# Allegro board motor_encoder_brd_updated.brd
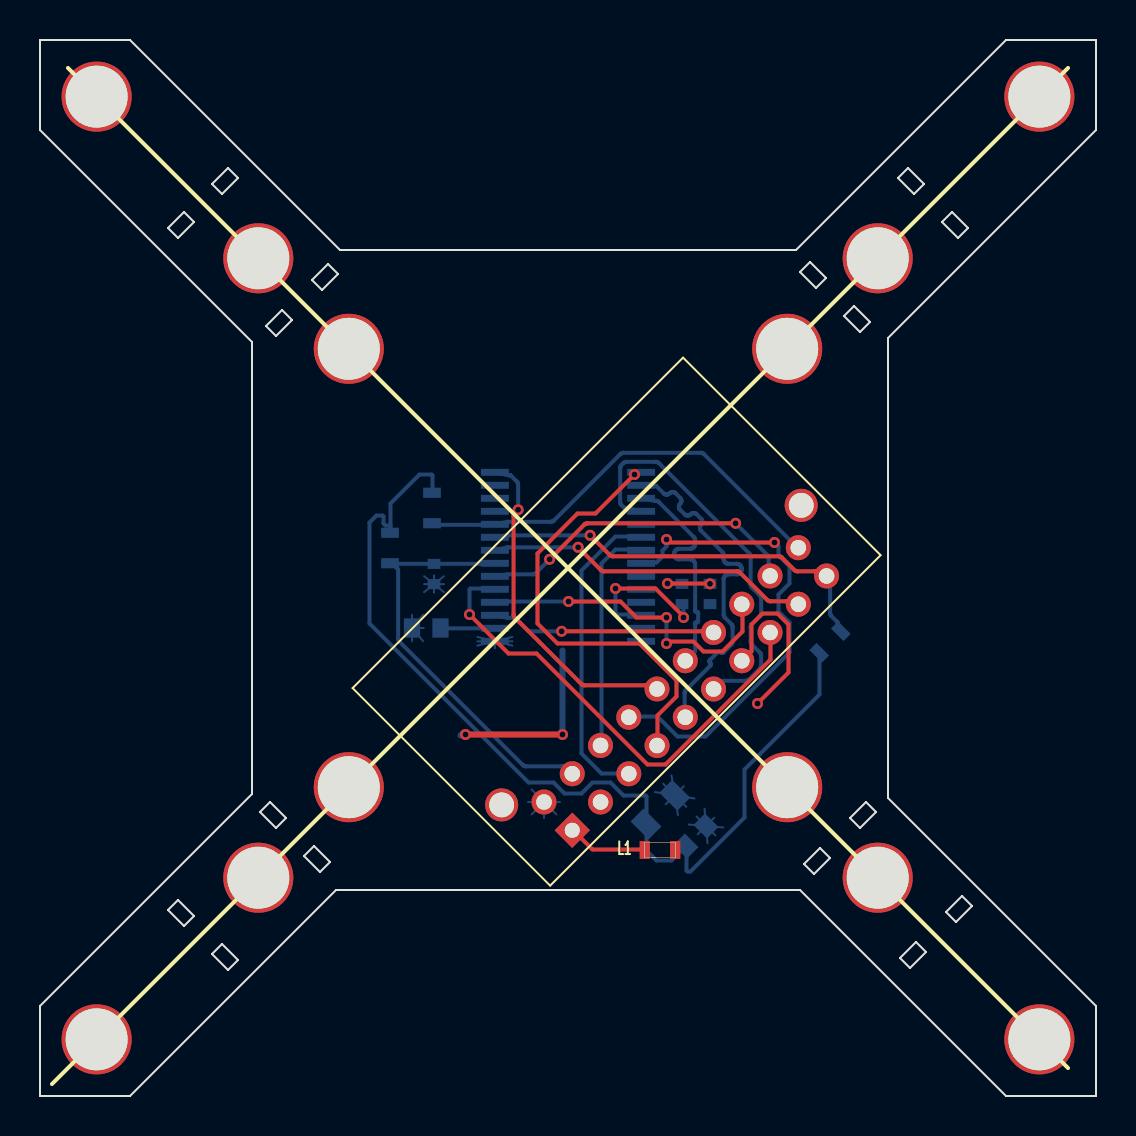
[diagram p0: board, top side]
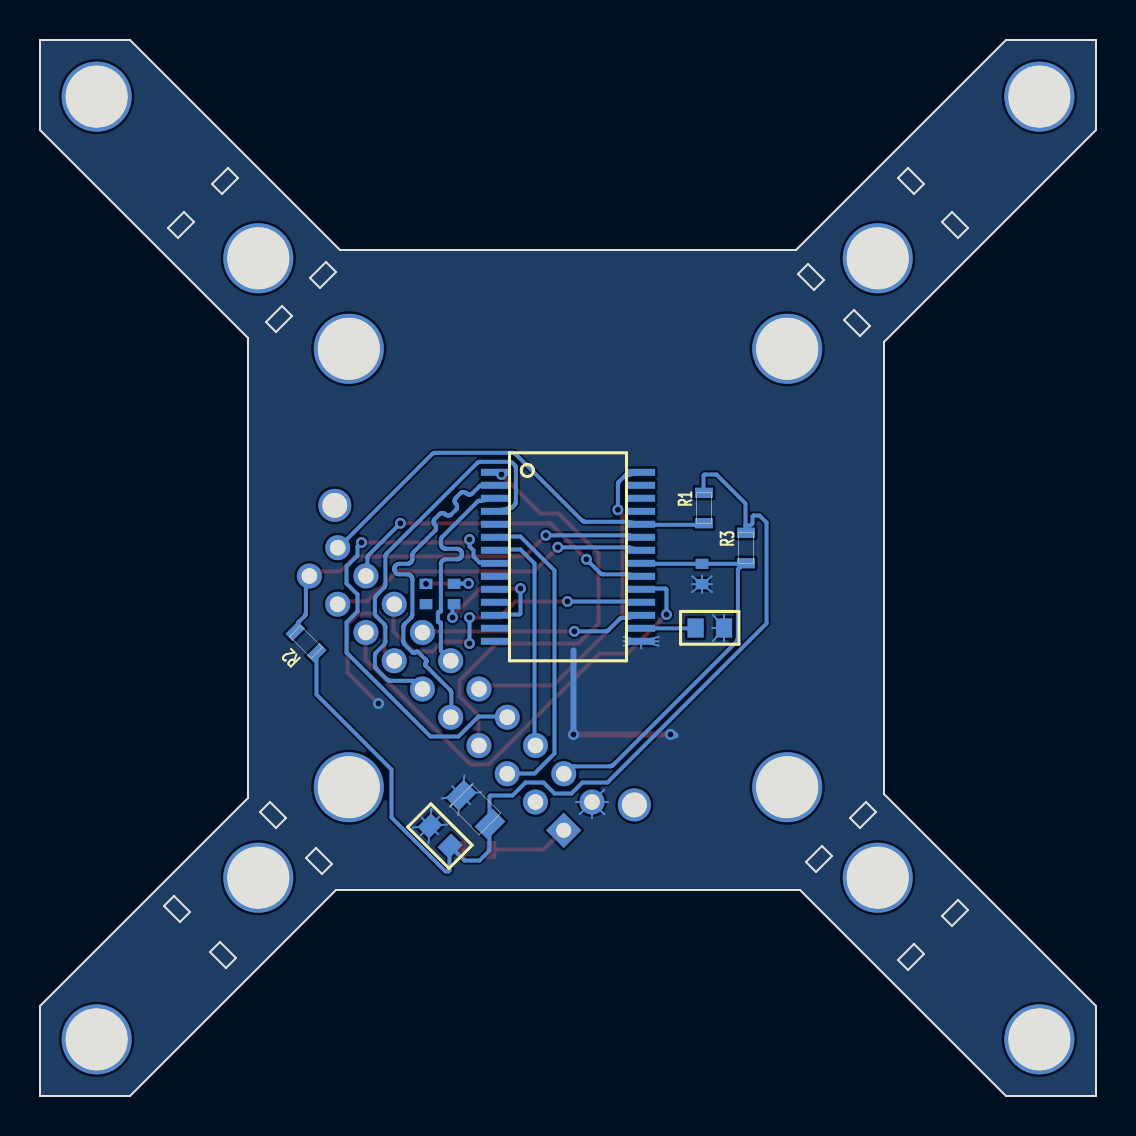
[diagram p1: board, bottom side, seen from below]

Outline 52.8 x 52.8 mm; copper layers: TOP, BOTTOM. Coordinates in mm from the lower left corner of the outline.
Outline path: 0,52.8 0,48.3 10.6,37.7 10.6,15.1 0,4.5 0,0 4.5,0 14.8,10.3 38,10.3 48.3,0 52.8,0 52.8,4.5 42.4,14.9 42.4,37.9 52.8,48.3 52.8,52.8 48.3,52.8 37.8,42.3 15,42.3 4.5,52.8 0,52.8 ; 6.4,43.4 7.2,44.2 7.7,43.7 6.9,42.9 6.4,43.4 ; 6.4,9.3 6.9,9.8 7.7,9 7.2,8.5 6.4,9.3 ; 8.6,45.6 9.4,46.4 9.9,45.9 9.1,45.1 8.6,45.6 ; 8.6,7.1 9.1,7.6 9.9,6.8 9.4,6.3 8.6,7.1 ; 11,14.2 11.5,14.7 12.3,13.9 11.8,13.4 11,14.2 ; 11.3,38.5 12.1,39.3 12.6,38.8 11.8,38 11.3,38.5 ; 13.2,12 13.7,12.5 14.5,11.7 14,11.2 13.2,12 ; 13.6,40.8 14.4,41.6 14.9,41.1 14.1,40.3 13.6,40.8 ; 38,41.2 38.5,41.7 39.3,40.9 38.8,40.4 38,41.2 ; 38.2,11.6 39,12.4 39.5,11.9 38.7,11.1 38.2,11.6 ; 40.2,39 40.7,39.5 41.5,38.7 41,38.2 40.2,39 ; 40.5,13.9 41.3,14.7 41.8,14.2 41,13.4 40.5,13.9 ; 42.9,45.9 43.4,46.4 44.2,45.6 43.7,45.1 42.9,45.9 ; 43,6.9 43.8,7.7 44.3,7.2 43.5,6.4 43,6.9 ; 45.1,43.7 45.6,44.2 46.4,43.4 45.9,42.9 45.1,43.7 ; 45.3,9.2 46.1,10 46.6,9.5 45.8,8.7 45.3,9.2

## Design rules (mm)
constraint set DEFAULT: min track width 0.1
net group DP_A: nets A W/NCOS
net group DP_B: nets B RI

## Placement (name value [footprint] x y rotation side)
BR1  CIRCUIT BREAKER  [CAP0402]  19.7 26.1 90 bottom
BR2  CIRCUIT BREAKER  [CAP0402]  32.1 25.1 270 bottom
BR3  CIRCUIT BREAKER  [CAP0402]  33.5 25.1 270 bottom
C1  100n  [SMC0603]  18.6 23.4 0 bottom
C2  100n  [SMC0603]  33.3 13.5 225 bottom
C3  10u  [CAP0805]  30.3 13.6 45 bottom
J1  S20B-PADSS-1(LF)(SN)  [JST_PADSS_90DEG_10X2]  25.2 14.7 45 top
L1  BLM18PG300SN1D  [RES0603]  31 12.3 180 top
NOREF  -  [unnamed]  10.91 10.91 0 top
NOREF#2  -  [#2]  52.8 0 90 top
NOREF#3  -  [unnamed]  15.44 37.36 0 top
NOREF#4  -  [#2]  10.91 10.91 90 top
NOREF#5  -  [#2]  53.09 46.37 0 top
NOREF#6  -  [unnamed]  2.83 49.97 0 top
NOREF#7  -  [#2]  2.83 49.97 0 top
NOREF#8  -  [unnamed]  10.91 41.89 0 top
NOREF#9  -  [unnamed]  49.97 2.83 0 top
NOREF#10  -  [#2]  10.91 10.91 0 top
NOREF#11  -  [#2]  2.83 2.83 90 top
NOREF#12  -  [unnamed]  2.83 2.83 0 top
NOREF#13  -  [unnamed]  37.36 15.44 0 top
NOREF#14  -  [#2]  0 52.8 0 top
NOREF#15  -  [unnamed]  49.97 49.97 0 top
NOREF#16  -  [unnamed]  37.36 37.36 0 top
NOREF#17  -  [unnamed]  41.89 41.89 0 top
NOREF#18  -  [#2]  44.9 38.12 0 top
NOREF#19  -  [#2]  41.04 31.48 0 top
NOREF#20  -  [#2]  15.44 15.44 0 top
NOREF#21  -  [#2]  38 10.3 90 top
NOREF#22  -  [#2]  2.83 2.83 0 top
NOREF#23  -  [unnamed]  15.44 15.44 0 top
NOREF#24  -  [#2]  15.44 15.44 90 top
NOREF#25  -  [unnamed]  41.89 10.91 0 top
R1  51k  [RES0603]  19.6 29.4 90 bottom
R2  51k  [RES0603]  39.5 22.7 225 bottom
R3  51k  [RES0603]  17.5 27.4 90 bottom
U1  AM4096  [SSOP28-LD]  26.4 26.96 270 bottom

## Library data of the parts
BR1-BR3 = CIRCUIT BREAKER_0
C1 = C: signal model: DEFAULT_CAPACITOR_100000pF_2_1
C2 = C: signal model: capacitor20pF
C3 = C_elect_0: signal model: DEFAULT_CAPACITOR_1e+07pF_2_1
J1 = HEADER 10X2
L1 = CHOKE HASH-IRON: signal model: cable_espice
R1-R3 = R: signal model: DEFAULT_RESISTOR_51000OHM_2_1
U1 = AM4096: signal model: CDS_lvds_device

## Footprints (pads in the part's own frame, mm; a bottom-side part is the same pattern mirrored in y, then rotated)
CAP0402
  rect 0.508x0.635 smd: 1(-0.508,0) 2(0.508,0)
CAP0805
  rect 0.914x1.27 smd: 1(0,0) 2(2.032,0)
JST_PADSS_90DEG_10X2
  round 1.65 hole 1.245: (-1.6,1.395) (19.582,1.395)
  rect 1.25x1.25 hole 0.75: 1(0,-2)
  round 1.25 hole 0.78: 2(0,0) 3(1.998,-2) 4(1.998,0) 5(3.996,-2) 6(3.996,0) 7(5.994,-2) 8(5.994,0) 9(7.992,-2) 10(7.992,0) 11(9.99,-2) 12(9.99,0) 13(11.988,-2) 14(11.988,0) 15(13.986,-2) 16(13.986,0) 17(15.984,-2) 18(15.984,0) 19(17.982,-2) 20(17.982,0)
RES0603
  rect 0.508x0.889 smd: 1(-0.762,0) 2(0.762,0)
SMC0603
  rect 0.813x0.965 smd: 1(0,0) 2(1.422,0)
SSOP28-LD
  rect 0.348x1.397 smd: 1(-4.225,-3.656) 2(-3.575,-3.656) 3(-2.925,-3.656) 4(-2.275,-3.656) 5(-1.625,-3.656) 6(-0.975,-3.656) 7(-0.325,-3.656) 8(0.325,-3.656) 9(0.975,-3.656) 10(1.625,-3.656) 11(2.275,-3.656) 12(2.925,-3.656) 13(3.575,-3.656) 14(4.225,-3.656) 15(4.225,3.656) 16(3.575,3.656) 17(2.925,3.656) 18(2.275,3.656) 19(1.625,3.656) 20(0.975,3.656) 21(0.325,3.656) 22(-0.325,3.656) 23(-0.975,3.656) 24(-1.625,3.656) 25(-2.275,3.656) 26(-2.925,3.656) 27(-3.575,3.656) 28(-4.225,3.656)
unnamed
  round 3.502 hole 3.1: 1(0,0)

## Nets
VIN: J1.1 L1.2
0: BR1.1 C1.1 C2.1 C3.2(-) J1.2 J1.13 U1.15
A: J1.11 U1.4
B: J1.12 U1.3
CLOCK: J1.10 U1.28
DATA: J1.7 U1.1
MAG: J1.14 U1.17
PSM: BR1.2 J1.4 R3.1 U1.21
REFN: J1.16 U1.18
REFP: J1.15 U1.19
RI: J1.9 U1.2
SCL: J1.20 R1.1 U1.24
SDA: J1.19 R2.1 U1.23
TD/PCOS: J1.8 U1.8
U/NSIN: J1.6 U1.7
V/PSIN: J1.5 U1.6
VEXT: BR2.1 BR3.1 C2.2 C3.1 L1.1 R1.2 R2.2 R3.2 U1.13
VOUT/TOUT: J1.18 U1.20
W/NCOS: J1.3 U1.5
ZERO: J1.17 U1.22(ZERO)
N01073: C1.2 U1.16
N03135: BR2.2 U1.12
N03141: BR3.2 U1.14

Pads without a net: NOREF 1; NOREF#3 1; NOREF#6 1; NOREF#8 1; NOREF#9 1; NOREF#12 1; NOREF#13 1; NOREF#15 1; NOREF#16 1; NOREF#17 1; NOREF#23 1; NOREF#25 1; U1 9 10 11 25 26 27

## Via types
v1: diameter 0.55, hole 0.3, TOP to BOTTOM, 20 vias

## Routing (per net, layer and track width the routed paths; a pad name or vN(x,y) marks a point on that pad's centre or on a via; arc(x,y) is an arc through that point)
VIN: length 4
  TOP w0.2: J1.1 26.61,13.29 26.67,13.27 27.62,12.32 30.22,12.32 30.24,12.3 L1.2
0: length 49.9
  TOP w0.2: J1.13 35.09,21.76 35.17,21.82 35.58,22.22 35.58,23.57 36.12,24.12 36.88,24.12 37.42,23.57 37.42,21.17 v1(35.88,19.62)
  TOP w0.3: v1(26.12,18.07) v1(21.27,18.07)
  BOTTOM w0.1: C3.2 32.19,15.49 ; C3.2 32.31,14.46 ; C3.2 30.75,15.2 ; C3.2 31.9,14.05 ; C3.2 31.29,14.59 ; C3.2 31.58,16.03 ; C3.2 31.16,15.61 ; C3.2 32.73,14.88 ; C2.1 34.16,13.43 ; C2.1 33.37,12.64 ; C2.1 32.44,13.57 ; C2.1 32.89,13.09 ; C2.1 32.83,13.97 ; C2.1 33.71,13.91 ; C2.1 33.77,13.03 ; C2.1 33.23,14.36 ; BR1.1 20.2,25.2 ; BR1.1 19.2,25.99 ; BR1.1 19.7,25.16 ; BR1.1 20.2,25.99 ; BR1.1 19.2,25.59 ; BR1.1 19.7,26.02 ; BR1.1 19.2,25.2 ; BR1.1 20.2,25.59 ; U1.15 23.62,22.52 ; U1.15 21.87,22.52 ; U1.15 22.74,22.38 ; U1.15 23.62,22.95 ; U1.15 23.62,22.73 ; U1.15 21.87,22.95 ; U1.15 21.87,22.73 ; 18.6,22.74 C1.1 ; C1.1 19.16,24.06 ; C1.1 19.18,23.4 ; C1.1 18.6,24.06 ; C1.1 19.16,22.74 ; 24.58,15.32 J1.2 ; J1.2 24.58,14.08 ; J1.2 25.82,14.08 ; J1.2 26,14.7 ; J1.2 25.2,13.9 ; J1.2 24.4,14.7
  BOTTOM w0.3: v1(21.27,18.07) 21.07,18.07 21.02,18.02 ; 26.12,22.27 v1(26.12,18.07)
A: length 20.5
  BOTTOM w0.2: J1.11 34.03,20.69 34.05,20.7 34.07,20.72 34.08,20.73 34.1,20.74 34.12,20.75 34.14,20.75 34.16,20.76 34.19,20.76 34.21,20.76 35.28,20.76 35.3,20.76 35.32,20.76 35.34,20.77 35.36,20.78 35.38,20.78 35.4,20.79 35.42,20.81 35.44,20.82 35.45,20.83 35.98,21.36 36,21.38 36.01,21.4 36.02,21.41 36.03,21.43 36.04,21.45 36.05,21.47 36.05,21.5 36.05,21.52 36.06,21.54 36.06,22.01 36.05,22.03 36.05,22.05 36.05,22.07 36.04,22.09 36.03,22.11 36.02,22.13 36.01,22.15 36,22.17 35.98,22.18 35.6,22.56 35.59,22.58 35.58,22.6 35.56,22.61 35.55,22.63 35.55,22.65 35.54,22.67 35.53,22.7 35.53,22.72 35.53,22.74 35.53,23.43 35.53,23.45 35.53,23.47 35.54,23.5 35.55,23.52 35.55,23.54 35.56,23.56 35.58,23.57 35.59,23.59 35.6,23.61 35.98,23.99 36,24 36.01,24.02 36.02,24.04 36.03,24.06 36.04,24.08 36.05,24.1 36.05,24.12 36.05,24.14 36.06,24.16 36.06,24.86 36.05,24.88 36.05,24.9 36.05,24.92 36.04,24.94 36.03,24.96 36.02,24.98 36.01,25 36,25.02 35.98,25.03 35.6,25.41 35.59,25.43 35.58,25.45 35.56,25.46 35.55,25.48 35.55,25.5 35.54,25.52 35.53,25.55 35.53,25.57 35.53,25.59 35.53,26.96 35.53,26.98 35.53,27 35.52,27.02 35.52,27.04 35.51,27.06 35.5,27.08 35.49,27.1 35.47,27.12 35.46,27.13 30.95,31.64 30.94,31.65 30.92,31.66 30.9,31.68 30.88,31.69 30.86,31.69 30.84,31.7 30.82,31.71 30.8,31.71 30.78,31.71 29.33,31.71 29.31,31.71 29.29,31.71 29.27,31.7 29.25,31.69 29.23,31.69 29.21,31.68 29.19,31.66 29.17,31.65 29.16,31.64 29.08,31.56 29.06,31.54 29.05,31.52 29.04,31.51 29.03,31.49 29.02,31.47 29.01,31.45 29.01,31.42 29.01,31.4 29.01,31.38 29.01,29.71 29.01,29.69 29.01,29.67 29.01,29.65 29.02,29.63 29.03,29.61 29.04,29.59 29.05,29.57 29.06,29.55 29.08,29.54 29.18,29.44 29.19,29.43 29.2,29.42 29.22,29.41 29.23,29.4 29.24,29.4 29.26,29.39 29.27,29.39 29.29,29.39 29.31,29.38 29.35,29.38 29.37,29.38 29.39,29.38 29.41,29.38 U1.4
B: length 12.3
  BOTTOM w0.2: 30.06,29.88 30.71,29.76 30.72,29.76 30.74,29.76 30.75,29.76 30.81,29.76 30.82,29.76 30.84,29.76 30.85,29.75 30.87,29.75 30.88,29.74 30.9,29.74 30.91,29.73 30.92,29.72 30.93,29.71 32.68,27.96 32.7,27.94 32.71,27.92 32.72,27.91 32.73,27.89 32.74,27.87 32.75,27.85 32.75,27.82 32.75,27.8 32.76,27.78 32.76,27.61 32.76,27.59 32.75,27.57 32.75,27.55 32.74,27.53 32.73,27.51 32.73,27.49 32.72,27.47 32.7,27.46 32.69,27.44 32.68,27.43 32.66,27.41 32.64,27.4 32.62,27.39 32.61,27.38 32.59,27.37 32.57,27.37 32.55,27.36 32.53,27.36 32.51,27.36 31.96,27.36 31.94,27.36 31.91,27.36 31.89,27.35 31.87,27.35 31.86,27.34 31.84,27.33 31.82,27.32 31.8,27.31 31.79,27.29 31.77,27.28 31.76,27.26 31.75,27.25 31.74,27.23 31.73,27.21 31.72,27.19 31.71,27.17 31.71,27.15 31.71,27.13 31.71,27.11 31.71,27.08 31.71,27.06 31.71,27.04 31.71,27.02 31.72,27 31.73,26.98 31.74,26.97 31.75,26.95 31.76,26.93 31.77,26.92 31.79,26.9 31.8,26.89 31.82,26.88 31.84,26.87 31.86,26.86 31.87,26.85 31.89,26.84 31.91,26.84 31.94,26.84 31.96,26.83 32.51,26.83 32.53,26.83 32.55,26.83 32.57,26.83 32.59,26.82 32.61,26.81 32.62,26.8 32.64,26.79 32.66,26.78 32.68,26.77 32.69,26.75 32.7,26.74 32.72,26.72 32.73,26.7 32.73,26.69 32.74,26.67 32.75,26.65 32.75,26.63 32.76,26.61 32.76,26.58 32.76,24.28 32.76,24.27 32.76,24.26 32.77,24.25 32.77,24.24 32.78,24.23 32.79,24.22 32.81,24.21 32.82,24.21 32.84,24.21 32.86,24.21 32.87,24.2 32.88,24.19 32.89,24.18 32.9,24.17 32.9,24.16 32.9,24.15 32.91,24.13 32.91,23.76 32.9,23.75 32.9,23.73 32.9,23.72 32.89,23.71 32.88,23.7 32.87,23.7 32.86,23.69 32.84,23.69 32.82,23.68 32.81,23.68 32.79,23.67 32.78,23.67 32.77,23.66 32.77,23.65 32.76,23.64 32.76,23.62 32.76,23.61 32.76,22.26 ; 32.76,22.26 32.7,22.21 J1.12 32.76,22.26
CLOCK: length 17.5
  TOP w0.2: J1.10 30.32,20.52 30.3,20.53 30.28,20.53 30.26,20.53 30.24,20.53 27.23,20.53 27.21,20.54 27.19,20.54 27.17,20.54 27.15,20.55 27.13,20.56 27.11,20.57 27.09,20.58 27.07,20.59 27.06,20.61 23.75,23.91 23.74,23.93 23.73,23.95 23.71,23.96 23.7,23.98 23.7,24 23.69,24.02 23.68,24.05 23.68,24.07 23.68,24.09 23.68,28.98 23.68,29 23.68,29.02 23.69,29.05 23.7,29.07 23.7,29.09 23.71,29.11 23.73,29.12 23.74,29.14 23.75,29.16 v1(23.91,29.31)
  BOTTOM w0.2: 23.53,31.03 U1.28 23.42,31.04 23.43,31.04 23.45,31.04 23.47,31.03 23.53,31.03 ; 23.53,31.03 23.83,30.73 23.85,30.72 23.86,30.7 23.87,30.68 23.88,30.66 23.89,30.64 23.9,30.62 23.9,30.6 23.9,30.58 23.91,30.56 v1(23.91,29.31)
DATA: length 22.1
  TOP w0.2: J1.7 30.85,17.53 30.88,17.62 30.88,19.02 31.82,19.97 31.82,20.77 29.97,22.62 25.88,22.62 24.88,23.62 24.88,27.12 26.88,29.12 27.77,29.12 v1(29.72,31.07)
  BOTTOM w0.2: v1(29.72,31.07) U1.1
MAG: length 11.2
  TOP w0.2: v1(26.08,23.23) 33.06,23.23 J1.14
  BOTTOM w0.2: U1.17 23.36,23.91 23.37,23.91 23.39,23.91 23.41,23.91 23.65,23.91 23.67,23.91 23.7,23.91 23.72,23.9 23.74,23.89 23.76,23.89 23.78,23.88 23.8,23.86 23.81,23.85 23.83,23.84 24.36,23.31 24.37,23.29 24.39,23.28 24.41,23.27 24.43,23.26 24.45,23.25 24.47,23.24 24.49,23.24 24.51,23.24 24.53,23.23 v1(26.08,23.23)
PSM: length 20.7
  BOTTOM w0.2: 22.74,26.63 22.05,26.61 20.01,26.61 BR1.2 19.41,26.61 17.91,26.61 R3.1 17.79,26.46 17.81,26.45 17.82,26.43 17.84,26.42 17.85,26.4 17.86,26.39 17.87,26.37 17.88,26.35 17.89,26.33 17.9,26.31 17.9,26.29 17.91,26.27 17.91,26.25 17.91,22.89 17.91,22.87 17.91,22.85 17.91,22.82 17.92,22.8 17.93,22.78 17.94,22.76 17.95,22.75 17.96,22.73 17.98,22.71 24.13,16.56 24.15,16.54 24.17,16.53 24.18,16.52 24.2,16.51 24.22,16.5 24.24,16.49 24.27,16.49 24.29,16.49 24.31,16.48 26.07,16.48 26.09,16.48 26.11,16.48 26.13,16.48 26.15,16.47 26.17,16.46 26.19,16.45 26.21,16.44 26.22,16.43 J1.4
REFN: length 16.1
  TOP w0.2: v1(26.42,24.72) 29.02,24.72 29.82,23.92 v1(31.32,23.92) ; J1.16 35.09,24.59 35.12,24.57 35.12,23.22 34.12,22.22 33.17,22.22 32.67,22.72 31.42,22.72 v1(31.32,22.62)
  BOTTOM w0.2: U1.18 22.82,24.72 v1(26.42,24.72) ; v1(31.32,22.62) v1(31.32,23.92)
REFP: length 24.3
  TOP w0.2: J1.15 36.52,23.17 36.52,21.82 31.27,16.57 30.38,16.57 24.82,22.12 23.42,22.12 v1(21.47,24.07)
  BOTTOM w0.2: 22.74,25.33 22.72,25.38 21.52,25.38 21.47,25.32 v1(21.47,24.07)
RI: length 18.2
  BOTTOM w0.2: J1.9 32.23,19.48 32.23,20.13 32.23,20.15 32.23,20.17 32.24,20.2 32.25,20.22 32.25,20.24 32.26,20.26 32.28,20.27 32.29,20.29 32.3,20.31 33.51,21.51 33.52,21.52 33.53,21.54 33.53,21.56 33.54,21.58 33.54,21.59 33.53,21.61 33.53,21.63 33.52,21.65 33.51,21.65 33.5,21.67 33.49,21.68 33.48,21.7 33.48,21.72 33.47,21.73 33.48,21.75 33.48,21.77 33.49,21.79 33.5,21.8 33.51,21.81 33.88,22.18 33.9,22.2 33.91,22.21 33.93,22.21 33.95,22.22 33.97,22.22 33.98,22.21 34,22.21 34.02,22.2 34.02,22.19 34.04,22.18 34.05,22.17 34.07,22.16 34.09,22.16 34.11,22.15 34.12,22.16 34.14,22.16 34.16,22.17 34.17,22.18 34.18,22.18 34.56,22.56 34.57,22.58 34.59,22.6 34.6,22.61 34.61,22.63 34.62,22.65 34.62,22.67 34.63,22.7 34.63,22.72 34.63,22.74 34.63,23.43 34.63,23.45 34.63,23.47 34.62,23.5 34.62,23.52 34.61,23.54 34.6,23.56 34.59,23.57 34.57,23.59 34.56,23.61 34.25,23.91 34.24,23.93 34.23,23.95 34.21,23.96 34.2,23.98 34.2,24 34.19,24.02 34.18,24.05 34.18,24.07 34.18,24.09 34.18,25.83 34.18,25.86 34.18,25.88 34.19,25.9 34.19,25.92 34.2,25.94 34.21,25.95 34.22,25.97 34.23,25.99 34.25,26 34.26,26.02 34.28,26.03 34.29,26.04 34.31,26.05 34.33,26.06 34.35,26.07 34.37,26.08 34.39,26.08 34.41,26.08 34.43,26.08 34.83,26.08 34.85,26.09 34.87,26.09 34.89,26.09 34.91,26.1 34.93,26.11 34.95,26.12 34.97,26.13 34.98,26.14 35,26.15 35.01,26.17 35.03,26.18 35.04,26.2 35.05,26.22 35.06,26.23 35.07,26.25 35.07,26.27 35.08,26.29 35.08,26.31 35.08,26.33 35.08,26.36 35.08,26.38 35.08,26.4 35.07,26.42 35.07,26.44 35.06,26.46 35.05,26.48 35.04,26.5 35.03,26.51 35.01,26.53 35,26.54 34.98,26.56 34.97,26.57 34.95,26.58 34.93,26.59 34.91,26.6 34.89,26.6 34.87,26.61 34.85,26.61 34.83,26.61 34.43,26.61 34.41,26.61 34.39,26.61 34.37,26.62 34.35,26.62 34.33,26.63 34.31,26.64 34.29,26.65 34.28,26.66 34.26,26.68 34.25,26.69 34.23,26.71 34.22,26.72 34.21,26.74 34.2,26.76 34.19,26.78 34.19,26.8 34.18,26.82 34.18,26.84 34.18,26.86 34.18,27.03 34.18,27.05 34.18,27.07 34.17,27.1 34.17,27.12 34.16,27.14 34.15,27.16 34.14,27.17 34.12,27.19 34.11,27.21 33.06,28.26 33.04,28.27 33.03,28.29 33.02,28.3 33.01,28.32 33.01,28.34 33,28.36 33,28.37 32.99,28.39 32.99,28.41 32.99,28.43 33,28.45 33,28.46 33.01,28.48 33.01,28.5 33.02,28.52 33.03,28.53 33.04,28.55 33.07,28.57 33.08,28.59 33.09,28.6 33.1,28.62 33.11,28.64 33.11,28.66 33.11,28.67 33.12,28.69 33.12,28.71 33.12,28.73 33.11,28.75 33.11,28.76 33.11,28.78 33.1,28.8 33.09,28.82 33.08,28.83 33.07,28.85 33.06,28.86 32.83,29.08 32.82,29.1 32.8,29.11 32.79,29.12 32.77,29.13 32.75,29.13 32.74,29.14 32.72,29.14 32.7,29.15 32.68,29.15 32.66,29.15 32.64,29.14 32.63,29.14 32.61,29.13 32.59,29.13 32.57,29.12 32.56,29.11 32.54,29.1 32.52,29.07 32.5,29.06 32.49,29.05 32.47,29.04 32.45,29.04 32.44,29.03 32.42,29.03 32.4,29.02 32.38,29.02 32.36,29.02 32.34,29.03 32.33,29.03 32.31,29.04 32.29,29.04 32.27,29.05 32.26,29.06 32.24,29.07 32.23,29.08 32.01,29.31 31.99,29.32 31.98,29.34 31.97,29.35 31.96,29.37 31.96,29.39 31.95,29.41 31.95,29.42 31.94,29.44 31.94,29.46 31.94,29.48 31.95,29.5 31.95,29.51 31.96,29.53 31.96,29.55 31.97,29.57 31.98,29.58 31.99,29.6 32.02,29.62 32.03,29.64 32.04,29.65 32.05,29.67 32.06,29.69 32.06,29.71 32.06,29.72 32.07,29.74 32.07,29.76 32.07,29.78 32.06,29.8 32.06,29.81 32.06,29.83 32.05,29.85 32.04,29.87 32.03,29.88 32.02,29.9 32.01,29.91 31.78,30.13 31.77,30.15 31.75,30.16 31.74,30.17 31.72,30.18 31.7,30.18 31.69,30.19 31.67,30.19 31.65,30.2 31.63,30.2 31.61,30.2 31.59,30.19 31.58,30.19 31.56,30.18 31.54,30.18 31.52,30.17 31.51,30.16 31.49,30.15 31.47,30.12 31.45,30.11 31.44,30.1 31.42,30.09 31.4,30.09 31.39,30.08 31.37,30.08 31.35,30.07 31.33,30.07 31.31,30.07 31.29,30.08 31.28,30.08 31.26,30.09 31.24,30.09 31.22,30.1 31.21,30.11 31.19,30.12 31.18,30.13 30.81,30.51 ; 30.81,30.51 U1.2 30.75,30.51 30.81,30.51
SCL: length 21.7
  BOTTOM w0.2: R1.1 19.98,28.56 20,28.56 20.01,28.56 20.03,28.56 22.05,28.56 U1.24 23.36,28.71 23.37,28.71 23.39,28.71 23.41,28.71 25.53,28.71 25.55,28.71 25.57,28.71 25.59,28.72 25.61,28.73 25.63,28.73 25.65,28.74 25.67,28.76 25.69,28.77 25.7,28.78 29.01,32.09 29.02,32.1 29.04,32.11 29.06,32.13 29.08,32.14 29.1,32.14 29.12,32.15 29.14,32.16 29.16,32.16 29.18,32.16 33.03,32.16 33.05,32.16 33.07,32.16 33.09,32.15 33.11,32.14 33.13,32.14 33.15,32.13 33.17,32.11 33.19,32.1 33.2,32.09 37.48,27.81 J1.20
SDA: length 20.3
  TOP w0.2: v1(27.51,28.04) 28.48,27.06 28.5,27.04 28.52,27.03 28.53,27.02 28.55,27.01 28.57,27 28.59,26.99 28.62,26.99 28.64,26.99 28.66,26.98 36.93,26.98 36.95,26.98 36.97,26.98 36.99,26.98 37.01,26.97 37.03,26.96 37.05,26.95 37.07,26.94 37.09,26.93 37.1,26.91 37.71,26.31 37.72,26.29 37.74,26.28 37.76,26.27 37.78,26.26 37.8,26.25 37.82,26.24 37.84,26.24 37.86,26.24 37.88,26.23 38.71,26.23 38.73,26.23 38.75,26.23 38.76,26.23 38.78,26.22 38.8,26.22 J1.19
  BOTTOM w0.2: U1.23 23.38,28.04 v1(27.51,28.04) ; R2.1 39.9,23.63 39.89,23.65 39.88,23.67 39.88,23.68 39.87,23.7 39.85,23.71 39.84,23.72 39.58,23.99 39.56,24 39.55,24.02 39.54,24.04 39.53,24.06 39.52,24.08 39.51,24.1 39.51,24.12 39.51,24.14 39.51,24.16 39.51,25.37 39.51,25.39 39.5,25.41 39.5,25.43 39.5,25.45 J1.19
TD/PCOS: length 24.1
  TOP w0.2: v1(31.32,27.82) 31.47,27.67 v1(36.72,27.67)
  BOTTOM w0.2: J1.8 29.44,18.94 29.52,18.97 30.88,18.97 31.88,17.97 33.27,17.97 37.47,22.17 37.47,23.67 36.92,24.22 36.92,25.07 37.47,25.62 37.47,26.47 36.92,27.02 36.92,27.47 v1(36.72,27.67) ; v1(31.32,27.82) 31.32,27.47 31.12,27.27 31.12,26.97 30.82,26.67 30.12,26.67 U1.8
U/NSIN: length 11.4
  BOTTOM w0.2: J1.6 28.03,17.53 28.07,17.62 28.07,26.62 28.77,27.32 30.02,27.32 30.06,27.29
V/PSIN: length 15.6
  BOTTOM w0.2: J1.5 29.42,16.12 28.07,16.12 27.07,17.12 27.07,26.27 28.77,27.97 30.02,27.97 U1.6
VEXT: length 52.8
  TOP w0.2: v1(33.5,25.61) 33.48,25.62 v1(31.38,25.62)
  BOTTOM w0.2: BR2.1 32.12,25.62 v1(31.38,25.62) ; 17.52,28.52 17.27,28.52 17.17,28.62 17.17,28.97 17.12,29.02 16.82,29.02 16.47,28.67 16.47,23.62 24.42,15.67 25.67,15.67 26.22,15.12 27.07,15.12 27.62,15.67 28.52,15.67 29.17,15.02 30.27,15.02 30.32,14.97 30.32,13.62 30.3,13.6 30.32,13.57 30.32,12.27 30.82,11.77 31.57,11.77 C2.2 32.32,12.52 32.32,11.27 32.38,11.22 32.52,11.22 35.22,13.92 35.22,16.32 38.97,20.07 38.97,22.12 38.96,22.16 R2.2 ; 17.52,28.52 17.52,29.62 18.97,31.07 19.57,31.07 19.62,31.02 19.62,30.17 19.6,30.16 R1.2 ; 17.52,28.52 17.52,28.22 17.5,28.16 R3.2
VOUT/TOUT: length 16.4
  TOP w0.2: v1(34.78,28.63) 27.38,28.63 27.36,28.63 27.34,28.63 27.32,28.63 27.3,28.62 27.28,28.61 27.26,28.6 27.24,28.59 27.22,28.58 27.21,28.56 v1(25.48,26.83)
  BOTTOM w0.2: U1.20 23.38,26.08 24.63,26.08 24.65,26.09 24.67,26.09 24.69,26.09 24.71,26.1 24.73,26.11 24.75,26.12 24.77,26.13 24.79,26.14 24.8,26.16 v1(25.48,26.83) ; v1(34.78,28.63) 36.36,27.06 36.37,27.04 36.39,27.02 36.4,27.01 36.41,26.99 36.42,26.97 36.42,26.95 36.43,26.92 36.43,26.9 36.43,26.88 36.43,26.61 J1.18
ZERO: length 16.3
  TOP w0.2: J1.17 37.36,24.73 37.34,24.73 37.32,24.73 37.3,24.73 36.53,24.73 36.51,24.74 36.49,24.74 36.47,24.74 36.45,24.75 36.43,24.76 36.41,24.77 36.39,24.78 36.37,24.79 36.36,24.81 35,26.16 34.99,26.18 34.97,26.19 34.95,26.2 34.93,26.21 34.91,26.22 34.89,26.23 34.87,26.23 34.85,26.23 34.83,26.23 28.21,26.23 28.19,26.24 28.17,26.24 28.14,26.24 28.12,26.25 28.1,26.26 28.08,26.27 28.07,26.28 28.05,26.29 28.03,26.31 v1(26.91,27.43)
  BOTTOM w0.2: U1.22 23.35,27.43 23.37,27.43 23.39,27.43 23.41,27.43 v1(26.91,27.43)
N01073: length 2.7
  BOTTOM w0.2: C1.2 20.38,23.38 U1.16
N03135: length 7.3
  TOP w0.2: v1(32.17,23.92) 32.17,23.97 30.77,25.38 v1(28.77,25.38)
  BOTTOM w0.2: v1(28.77,25.38) 28.77,24.12 28.82,24.07 30.02,24.07 U1.12 ; BR2.2 32.17,24.57 v1(32.17,23.92)

## Copper pours and planes (outline as drawn; the poured copper is in the pictures)
0 on BOTTOM: 0,52.8 4.5,52.8 15,42.3 37.8,42.3 48.3,52.8 52.8,52.8 52.8,48.3 42.4,37.9 42.4,14.9 52.8,4.5 52.8,0 48.3,0 38,10.3 14.8,10.3 4.5,0 0,0 0,4.5 10.6,15.1 10.6,37.7 0,48.3
